# Altium PCB John_Main.PcbDoc (part 5 of 5)
Units mil, origin at the board's own origin, x right, y up, seen from the top; angles counter-clockwise.
Board outline 3346 x 2756 mil, 2 copper layers (Top Layer, Bottom Layer), stack 57 mil thick; 275 components, 161 nets, 721 pads, 398 vias.
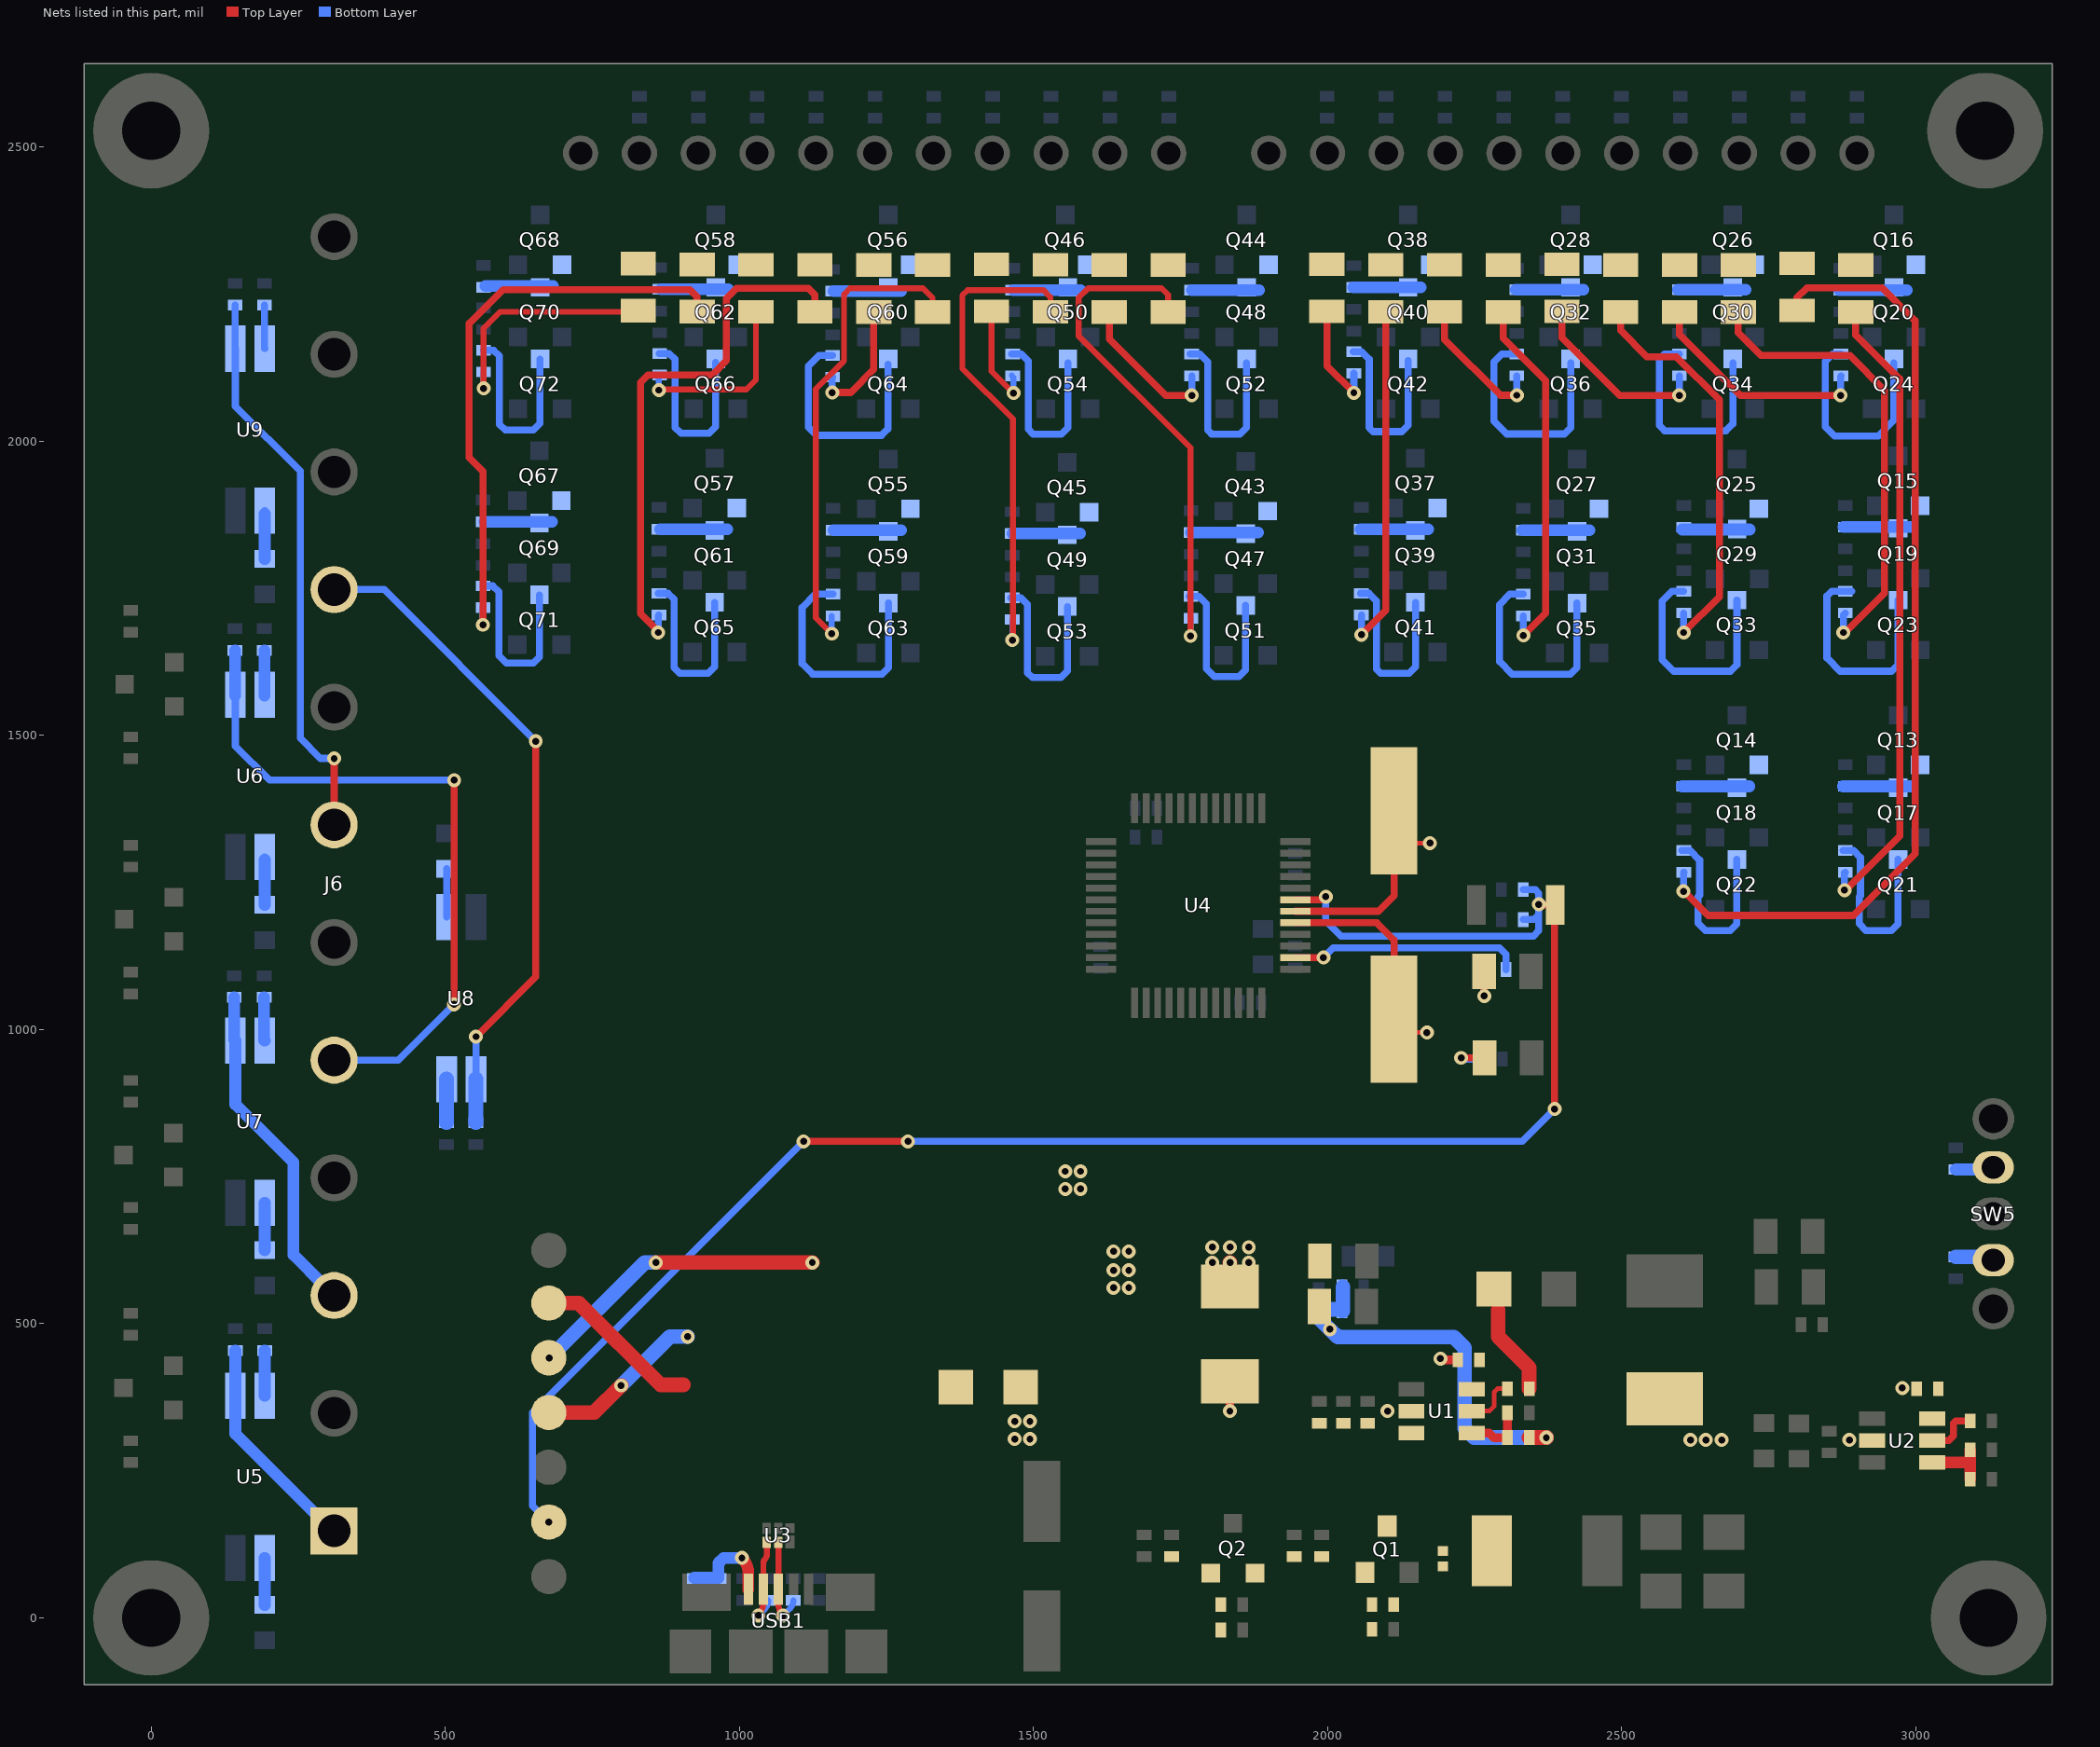
[diagram p3: the nets of this part, all layers, seen from the top]

## Via types
v1: diameter 23.62, hole 11.81, Top Layer to Bottom Layer, tented both sides, 233 vias
v2: diameter 23.62, hole 15.75, Top Layer to Bottom Layer, tented both sides, 165 vias

## Nets (pads, with @x,y where several pads share a name; then routed paths per layer and width w, separated by ;. In a path a pad name is that pad's centre, name@x,y a point inside that pad or via, vN(x,y) a via of type N, cw(c..) or ccw(c..) an arc to the next point about the centre after c; other vN are vias at no path point) (continued)
MCU_5V: C1.1 C10.1 CF1.1 D1.K D2.K J4.1 R1.2 U1.3 | length 670.5
  Top Layer w25: v1(858,604) v1(1124,604) ; 2290,524 2290,478 2342.81,425.19 R1.2@2342.81,389.5
  Bottom Layer w25: v1(677,442) 839,604 v1(858,604)
  other v1: 1468,304 1494,304 1468,334 1494,334
NetC2_1: C2.1 U1.6
NetC13_1: C13.1 Q1.1 Q2.2 R7.2 R8.2 R9.1
NetC14_1: C14.1 R8.1
NetC14_2: C14.2 F1.1 Q1.3
NetC17_2: C17.2 Q2.1 R6.2 R10.2
NetCF5_1: CF5.1 U2.6
NetLED1_1: LED1.1 R3.1 | length 75.5
  Top Layer w12: v1(2227,952) LED1.1@2267,952
  Bottom Layer w12: v1(2227,952) 2227,950 R3.1@2260.5,950
NetLED2_1: LED2.1 R58.2 | length 91.2
  Top Layer w12: LED2.1@2266,1103 2266.5,1102.5 v1(2266.5,1057)
  Bottom Layer w12: v1(2266.5,1057) R58.2@2266.5,1102
NetLED3_2: LED3.2 R67.1 | length 1086.2
  Top Layer w12: v1(2879,1237) 2881,1237 2973,1329 2973,2106 2898,2181 LED3.2@2898,2219.69 LED3.2@2898,2221
  Bottom Layer w12: v1(2879,1237) 2879,1266.18 R67.1@2880.32,1267.5
NetLED4_2: LED4.2 R68.1 | length 1647.8
  Top Layer w12: v1(2605,1235) 2606,1235 2647,1194 2893.94,1194 2999,1299.06 2999,2205.06 2943.06,2261 2815,2261 2798.11,2244.11 LED4.2@2798.11,2222.65 LED4.2@2798.11,2221
  Bottom Layer w12: v1(2605,1235) 2605,1266.07 2606,1267.07 R68.1@2605.58,1267.5
NetLED5_2: LED5.2 R69.1 | length 803
  Top Layer w12: LED5.2@2698.22,2221 LED5.2@2698.22,2219.65 2698.22,2184.78 2737,2146 2888,2146 2947,2087 2947,1741.68 2880.32,1675 v1(2877,1675)
  Bottom Layer w12: v1(2877,1675) 2877,1704.86 R69.1@2880.32,1708.18
NetLED6_2: LED6.2 R70.1 | length 389.5
  Top Layer w12: LED6.2@2598.33,2221 2598.33,2181.67 2702,2078 v1(2872,2078)
  Bottom Layer w12: v1(2872,2078) 2872,2110.23 R70.1@2872.95,2111.18
NetLED7_2: LED7.2 R79.1 | length 706.3
  Top Layer w12: LED7.2@2498.44,2221 2498.44,2188.56 2543,2144 2593,2144 2666,2071 2666,1735.42 v1(2605.58,1675) v1@2609,1675
  Bottom Layer w12: v1(2605.58,1675) R79.1@2605.58,1708.18
NetLED8_2: LED8.2 R80.1 | length 318.2
  Top Layer w12: LED8.2@2398.56,2221 2398.56,2176.44 2496.9,2078.1 v1(2598,2078.1)
  Bottom Layer w12: v1(2598,2078.1) 2598,2111.28 R80.1@2598.21,2111.5
NetLED9_2: LED9.2 R81.1 | length 629.9
  Top Layer w12: LED9.2@2298.67,2221 2298.67,2175.33 2371,2103 2371,1708.17 v1(2332.83,1670)
  Bottom Layer w12: v1(2332.83,1670) R81.1@2332.83,1703.18
NetLED10_2: LED10.2 R82.1 | length 243.3
  Top Layer w12: LED10.2@2198.78,2221 LED10.2@2198.78,2220.15 2198.78,2173.22 2293.68,2078.32 v1(2321.82,2078.32)
  Bottom Layer w12: v1(2321.82,2078.32) R82.1@2321.82,2111.5
NetLED11_2: LED11.2 R87.1 | length 600
  Top Layer w12: v1(2057.55,1671.32) 2098.89,1712.66 LED11.2@2098.89,2221
  Bottom Layer w12: v1(2057.55,1671.32) R87.1@2057.55,1704.5
NetLED12_2: LED12.2 R88.1 | length 190.8
  Top Layer w12: LED12.2@1999,2221 1999,2128.04 v1(2044.72,2082.32)
  Bottom Layer w12: v1(2044.72,2082.32) R88.1@2044.72,2115.5
NetLED13_2: LED13.2 R98.1 | length 876.9
  Top Layer w10: LED13.2@1729,2220 1729,2249 1718,2260 1593,2260 1577,2244 1577,2179 1767,1989 v1(1767,1669)
  Bottom Layer w10: v1(1767,1669) R98.1@1767,1700
NetLED14_2: LED14.2 R99.1 | length 259.2
  Top Layer w12: LED14.2@1628.89,2220 1628.89,2174.11 1725,2078 v1(1769.17,2078)
  Bottom Layer w12: v1(1769.17,2078) R99.1@1769.17,2111.17
NetLED15_2: LED15.2 R100.1 | length 838.6
  Top Layer w10: v1(1464,1662) 1465,1663 1465,2038 1379,2124 1379,2248 1388,2257 1517,2257 1528.78,2245.22 LED15.2@1528.78,2220
  Bottom Layer w10: v1(1464,1662) R100.1@1464,1695
NetLED16_2: LED16.2 R101.1 | length 184.7
  Top Layer w10: LED16.2@1428.67,2220 1428.67,2119.33 v1(1466,2082)
  Bottom Layer w10: R101.1@1463,2112 1466,2109 v1(1466,2082)
NetLED17_2: LED17.2 R110.1 | length 823.1
  Top Layer w10: v1(1157,1673) 1130,1700 1130,2089 1178,2137 1178,2250 1188,2260 1312,2260 1328.56,2243.44 LED17.2@1328.56,2220
  Bottom Layer w10: v1(1157,1673) R110.1@1157,1703
NetLED18_2: LED18.2 R111.1 | length 210.7
  Top Layer w12: v1(1158,2083) 1189,2083 1228.44,2122.44 LED18.2@1228.44,2220
  Bottom Layer w12: v1(1158,2083) 1158,2108.69 R111.1@1158.48,2109.18
NetLED19_2: LED19.2 R112.1 | length 926.3
  Top Layer w12: v1(862,1675) 863,1676 832,1707 832,2100 845,2113 954,2113 978,2137 978,2243 995,2260 1117,2260 1128.33,2248.67 LED19.2@1128.33,2220.15 LED19.2@1128.33,2220
  Bottom Layer w12: v1(862,1675) 862,1703.38 R112.1@863.12,1704.5
NetLED20_2: LED20.2 R113.1 | length 314.5
  Top Layer w10: v1(863.12,2087) 863.12,2088.38 1011.66,2088.38 1028.22,2104.94 LED20.2@1028.22,2220
  Bottom Layer w10: v1(863.12,2087) 863.12,2111.12 R113.1@864.5,2112.5
NetLED21_2: LED21.2 R118.1 | length 994.1
  Top Layer w12: v1(564,1688) 564,1949 540.28,1972.72 540.28,2200.28 598,2258 916,2258 928.11,2245.89 LED21.2@928.11,2220
  Bottom Layer w12: v1(564,1688) 564,1716.81 R118.1@564.37,1717.18
NetLED22_2: LED22.2 R119.1 | length 403.8
  Top Layer w10: v1(565.09,2090) 565.09,2192.09 593,2220 LED22.2@828,2220
  Bottom Layer w10: v1@565.09,2090.73 R119.1@565.09,2118
NetQ13_1: Q13.1 Q17.3 R59.1 | length 114.5
  Bottom Layer w20: R59.1@2876.49,1413.5 2990.99,1413.5
NetQ14_1: Q14.1 Q18.3 R60.1 | length 114.5
  Bottom Layer w20: R60.1@2602.49,1413.5 2716.99,1413.5
NetQ15_1: Q15.1 Q19.3 R61.1 | length 114.5
  Bottom Layer w20: R61.1@2876.99,1854.18 2991.49,1854.18
NetQ16_1: Q16.1 Q20.3 R62.1 | length 114.5
  Bottom Layer w20: R62.1@2869.99,2257.18 2984.49,2257.18
NetQ21_3: Q21.3 R67.2 | length 332.8
  Bottom Layer w12: R67.2@2876.47,1304.5 R67.2@2880.32,1304.5 2894.5,1304.5 2906,1293 2906,1227.96 2903.85,1225.81 2903.85,1180.15 2915.5,1168.5 2958.4,1168.5 2969.5,1179.59 Q21.3@2969.5,1289.32
NetQ22_3: Q22.3 R68.2 | length 330.3
  Bottom Layer w12: R68.2@2602.47,1304.5 R68.2@2605.58,1304.5 2616.4,1304.5 2632.59,1288.3 2632.59,1228.55 2629.85,1225.81 2629.85,1181.15 2642.5,1168.5 2684.4,1168.5 2695.5,1179.59 Q22.3@2695.5,1289.32
NetQ23_3: Q23.3 R69.2 | length 395.1
  Bottom Layer w12: R69.2@2890.91,1745.18 R69.2@2880.32,1745.18 2857.18,1745.18 2849,1737 2849,1632 2871.82,1609.18 2958.91,1609.18 2970,1620.27 Q23.3@2970,1730
NetQ24_3: Q24.3 R70.2 | length 374
  Bottom Layer w12: R70.2@2872.95,2148.18 2859.18,2148.18 2846.5,2135.5 2846.5,2024.5 2862,2009 2936.41,2009 2963,2035.59 Q24.3@2963,2133
NetQ25_1: Q25.1 Q29.3 R71.1 | length 114.5
  Bottom Layer w20: R71.1@2602.99,1850.18 2717.49,1850.18
NetQ26_1: Q26.1 Q30.3 R72.1 | length 114.5
  Bottom Layer w20: R72.1@2596,2257.5 2710.5,2257.5
NetQ27_1: Q27.1 Q31.3 R73.1 | length 114.5
  Bottom Layer w20: R73.1@2330.99,1849.18 2445.49,1849.18
NetQ28_1: Q28.1 Q32.3 R74.1 | length 114.5
  Bottom Layer w20: R74.1@2320.36,2257.5 2434.86,2257.5
NetQ33_3: Q33.3 R79.2 | length 392.7
  Bottom Layer w12: R79.2@2605.58,1745.18 2585.44,1745.18 2569,1728.74 2569,1629 2588.82,1609.18 2684.91,1609.18 2696,1620.27 Q33.3@2696,1730
NetQ34_3: Q34.3 R80.2 | length 387.3
  Bottom Layer w12: R80.2@2598.21,2148.5 2572.99,2148.5 2564,2139.5 2564,2027.26 2573.26,2018 2677,2018 2689.01,2030.01 Q34.3@2689.01,2133.32
NetQ35_3: Q35.3 R81.2 | length 399.8
  Bottom Layer w12: R81.2@2332.83,1740.18 2309.9,1740.18 2292.1,1722.38 2292.1,1625.9 2313.82,1604.18 2412.91,1604.18 2424,1615.27 Q35.3@2424,1725
NetQ36_3: Q36.3 R82.2 | length 398.9
  Bottom Layer w12: R82.2@2321.82,2148.5 2296.5,2148.5 2283,2135 2283,2034.15 2304.65,2012.5 2402.27,2012.5 2413.36,2023.59 Q36.3@2413.36,2133.32
NetQ37_1: Q37.1 Q39.3 R83.1 | length 114.5
  Bottom Layer w20: R83.1@2056.45,1850.5 2170.95,1850.5
NetQ38_1: Q38.1 Q40.3 R84.1 | length 114.5
  Bottom Layer w20: R84.1@2044,2261.5 2158.5,2261.5
NetQ41_3: Q41.3 R87.2 | length 331.6
  Bottom Layer w12: R87.2@2056.43,1741.5 2070.36,1741.5 2083.26,1728.6 2083.26,1612.6 2090.36,1605.5 2138.36,1605.5 2149.46,1616.59 Q41.3@2149.46,1726.32
NetQ42_3: Q42.3 R88.2 | length 331.6
  Bottom Layer w12: R88.2@2043.98,2152.5 2057.91,2152.5 2070.81,2139.6 2070.81,2023.6 2077.91,2016.5 2125.91,2016.5 2137.01,2027.59 Q42.3@2137.01,2137.32
NetQ43_1: Q43.1 Q47.3 R90.1 | length 114.5
  Bottom Layer w20: R90.1@1767.61,1845.17 1882.11,1845.17
NetQ44_1: Q44.1 Q48.3 R91.1 | length 114.5
  Bottom Layer w20: R91.1@1769.17,2257.17 1883.69,2257.17
NetQ45_1: Q45.1 Q49.3 R92.1 | length 114.5
  Bottom Layer w20: R92.1@1464.52,1843.26 1579.02,1843.26
NetQ46_1: Q46.1 Q50.3 R93.1 | length 114.5
  Bottom Layer w20: R93.1@1465.61,2257.26 1580.11,2257.26
NetQ51_3: Q51.3 R98.2 | length 331.3
  Bottom Layer w12: R98.2@1764.61,1736.17 R98.2@1767.96,1736.17 1781.52,1736.17 1794,1723.7 1794,1613.3 1807.13,1600.17 1849.52,1600.17 1860.62,1611.27 Q51.3@1860.62,1721
NetQ52_3: Q52.3 R99.2 | length 334.6
  Bottom Layer w12: R99.2@1766.19,2148.17 R99.2@1769.17,2148.17 1783.1,2148.17 1796,2135.27 1796,2019.27 1803.1,2012.17 1851.1,2012.17 1862.2,2023.27 Q52.3@1862.2,2133
NetQ53_3: Q53.3 R100.2 | length 334.6
  Bottom Layer w12: R100.2@1461.51,1734.26 R100.2@1464.12,1734.26 1478.43,1734.26 1490,1722.69 1490,1606.69 1498.43,1598.26 1546.43,1598.26 1557.52,1609.35 Q53.3@1557.52,1719.08
NetQ54_3: Q54.3 R101.2 | length 334.6
  Bottom Layer w12: R101.2@1462.61,2148.26 R101.2@1464.84,2148.26 1479.52,2148.26 1491,2136.78 1491,2020.78 1499.52,2012.26 1547.52,2012.26 1558.62,2023.35 Q54.3@1558.62,2133.08
NetQ55_1: Q55.1 Q59.3 R102.1 | length 114.5
  Bottom Layer w20: R102.1@1160.43,1849.18 1274.93,1849.18
NetQ56_1: Q56.1 Q60.3 R103.1 | length 114.5
  Bottom Layer w20: R103.1@1159.99,2255.18 1274.49,2255.18
NetQ57_1: Q57.1 Q61.3 R104.1 | length 114.5
  Bottom Layer w20: R104.1@865,1850.5 979.5,1850.5
NetQ58_1: Q58.1 Q62.3 R105.1 | length 114.5
  Bottom Layer w20: R105.1@866.76,2258.5 981.26,2258.5
NetQ63_3: Q63.3 R110.2 | length 425.9
  Bottom Layer w12: R110.2@1159.29,1740.18 1129.18,1740.18 1106.6,1717.6 1106.6,1622.4 1124.82,1604.18 1242.34,1604.18 1253.43,1615.28 Q63.3@1253.43,1725
NetQ64_3: Q64.3 R111.2 | length 409.1
  Bottom Layer w12: R111.2@1158.48,2146.18 1135.18,2146.18 1117,2128 1117,2024 1130.82,2010.18 1241.91,2010.18 1253,2021.27 Q64.3@1253,2131
NetQ65_3: Q65.3 R112.2 | length 334.6
  Bottom Layer w12: R112.2@862,1741.5 878.91,1741.5 888.91,1731.5 888.91,1615.5 898.91,1605.5 946.91,1605.5 958.01,1616.59 Q65.3@958.01,1726.32
NetQ66_3: Q66.3 R113.2 | length 334.6
  Bottom Layer w12: R113.2@863.76,2149.5 880.67,2149.5 890.67,2139.5 890.67,2023.5 900.67,2013.5 948.67,2013.5 959.76,2024.59 Q66.3@959.76,2134.32
NetQ67_1: Q67.1 Q69.3 R114.1 | length 114.5
  Bottom Layer w20: R114.1@566.99,1863.18 681.49,1863.18
NetQ68_1: Q68.1 Q70.3 R115.1 | length 114.5
  Bottom Layer w20: R115.1@568.09,2264 682.59,2264
NetQ71_3: Q71.3 R118.2 | length 323.7
  Bottom Layer w12: R118.2@563.99,1754.18 R118.2@564.37,1754.18 580.91,1754.18 590.91,1744.18 590.91,1636.09 604,1623 649.8,1623 660,1633.2 Q71.3@660,1739
NetQ72_3: Q72.3 R119.2 | length 334.6
  Bottom Layer w12: R119.2@565.09,2155 582,2155 592,2145 592,2029 602,2019 650,2019 661.09,2030.09 Q72.3@661.09,2139.82
NetR1_1: R1.1 U1.5 | length 90.6
  Top Layer w8: U1.5@2244.97,351.5 2274.94,351.5 2282.94,359.5 2282.94,383.5 2288.95,389.5 R1.1@2305.81,389.5
NetRF10_1: RF10.1 U2.5 | length 90.4
  Top Layer w12: U2.5@3028.12,301.5 3055.94,301.5 3063.94,309.5 3063.94,330.5 3068.12,334.68 RF10.1@3092.45,334.68
NetRU2_1: RU2.1 SW5.1 | length 65.4
  Bottom Layer w20: RU2.1@3068,762.21 3128.56,762.21 SW5.1@3132,765.66
NetRU3_1: RU3.1 SW5.3 | length 66.2
  Bottom Layer w25: RU3.1@3068,613.5 3126.68,613.5 SW5.3@3132,608.18
OPT_IN1: R5.1 U5.1 | length 80
  Bottom Layer w20: R5.1@193,22 U5.1@193,102
OPT_IN2: R13.1 U7.1 | length 80.4
  Bottom Layer w20: R13.1@193,625.19 U7.1@193,705.6
OPT_IN3: R14.1 U6.1 | length 158.3
  Bottom Layer w12: R14.1@193,1212 U6.1@193,1293.41
  Bottom Layer w20: R14.1@193,1212 U6.1@193,1288.91
OPT_IN4: R22.1 U9.1 | length 158.9
  Bottom Layer w12: R22.1@193,1800.02 U9.1@193,1882.02
  Bottom Layer w20: R22.1@193,1800.02 U9.1@193,1876.93
OPT_IN5: R21.1 U8.1 | length 82
  Bottom Layer w12: U8.1@502.12,1191.29 R21.1@502.12,1273.29
OPT_OUT1: J6.1 R12.2 U5.3 | length 377.8
  Bottom Layer w20: R12.2@143,454.5 U5.3@143,377.59 143,313 308,148 J6.1@311,148
OPT_OUT2: J6.3 R20.2 U7.3 | length 573.2
  Bottom Layer w20: R20.2@141,1054.69 141,983.19 U7.3@143,981.19 143,873 242,774 242,617 294.74,564.26 301.47,571 J6.3@311,571
OPT_OUT3: J6.5 R19.2 U6.3 | length 1258.1
  Top Layer w12: v1(514.9,1043) 514.9,1422 v1@515,1422.1
  Bottom Layer w12: R19.2@142.38,1644.5 142.38,1569.62 U6.3@143,1569 143,1482 201,1424 514.9,1424 v1(515,1424.1) ; J6.5@311,948 419.9,948 v1(514.9,1043)
  Bottom Layer w20: U6.3@142.38,1567.59 R19.2@142.38,1644.5
OPT_OUT4: J6.7 R26.2 U9.3 | length 966.8
  Top Layer w12: J6.7@311,1348 v1(311,1461)
  Bottom Layer w12: R26.2@142.52,2231.52 142.52,2158.09 U9.3@143,2157.61 143,2060 253.5,1949.5 253.5,1495.5 288,1461 v1(311,1461)
OPT_OUT5: J6.9 R25.2 U8.3 | length 1140.2
  Top Layer w12: v1(552.12,988) 653.8,1089.68 v1(653.8,1490.3)
  Bottom Layer w12: J6.9@311,1748 396.09,1748 v1(653.8,1490.3) ; U8.3@552.12,915.7 v1(552.12,988)
  Bottom Layer w25: R25.2@552.12,841.79 U8.3@552.12,915.7
PIN4_1: R11.1 U5.4 | length 76.9
  Bottom Layer w20: U5.4@193,377.59 R11.1@193,454.5
PIN4_2: R15.1 U7.4 | length 73.9
  Bottom Layer w20: R15.1@192,1054.69 192,982.19 U7.4@193,981.19
PIN4_3: R18.1 U6.4 | length 152.7
  Bottom Layer w12: R18.1@192.38,1644.5 192.38,1569.62 U6.4@193,1569
  Bottom Layer w20: U6.4@192.38,1567.59 R18.1@192.38,1644.5
PIN4_4: R24.1 U9.4 | length 74.1
  Bottom Layer w12: R24.1@192.52,2231.52 192.52,2158.09 U9.4@193,2157.61
PIN4_5: R23.1 U8.4 | length 73.9
  Bottom Layer w25: R23.1@502.12,841.79 U8.4@502.12,915.7
RST#: CU8.2 J8.1 RU1.1 SW4.2 U4.7 | length 3119.4
  Top Layer w12: v1(1109,810) v1(1286.71,810) ; U4.7@1945.35,1220.84 1991.84,1220.84 v1(1997,1226) ; v1(2359,1213) 2360,1212 SW4.2@2386.93,1212 2386,1211.07 v1(2386,865)
  Bottom Layer w12: v1(676,162.87) 648,190.87 648,349 v1(1109,810) ; v1(1286.71,810) 2331,810 v1(2386,865) ; v1(1997,1226) 1997,1184.74 2022.74,1159 2350,1159 2359,1168 2359,1195 ; CU8.2@2332.5,1187 2351,1187 2359,1195 ; RU1.1@2332.5,1238 2353,1238 2359,1232 v1(2359,1213) 2359,1195
SW#: CF5.2 LF1.1 U2.2
  other v1: 2616.94,302.5 2643.25,302.5 2670.06,302.5 2887.06,302.5 2977.06,390.66
SW_: C2.2 L1.1 U1.2 | length 81.2
  Top Layer w15: v1@1833.94,352.5 L1.1@1833.94,402.04 ; v1(2191.94,440.66) 2191.94,438.5 C2.2@2221.44,438.5
  other v1: 1833.94,351.5 2101.94,351.5
TEST#: R58.1 U4.2 | length 395.3
  Top Layer w12: U4.2@1945.35,1122.42 v1(1993,1122.42)
  Bottom Layer w12: v1(1993,1122.42) 2009.58,1139 2292.1,1139 2303.5,1127.6 R58.1@2303.5,1102
USB_D+: R17.2 U3.2 USB1.3 | length 158.4
  Top Layer w10: U3.2@1066.44,128 USB1.3@1066.44,48.32 1066.44,23.13 ccw(c1093.49,23.13) v1(1074.36,4)
  Bottom Layer w10: v1(1074.36,4) 1086.26,15.9 ccw(c1072.35,29.82) R17.2@1092.03,29.82
USB_D-: R16.2 U3.1 USB1.2 | length 159.8
  Top Layer w10: v1(1032.36,4) 1032.36,6 ccw(c1011.87,26.49) 1040.85,26.49 USB1.2@1040.85,48.32 1040.85,93.43 cw(c1049.43,93.43) 1043.36,99.5 ccw(c1035.17,107.68) 1046.75,107.68 U3.1@1046.75,128
  Bottom Layer w10: v1(1032.36,4) 1043.13,14.77 ccw(c1028.08,29.82) R16.2@1049.36,29.82
VBUS: C32.1 C33.1 D2.A J2.1 USB1.1 | length 453
  Top Layer w20: v1(1004.36,102) cw(c978.06,75.7) 1015.25,75.7 USB1.1@1015.25,48.32
  Top Layer w25: J2.1@676,535.14 726.86,535.14 866,396 905,396
  Bottom Layer w20: C32.1@923.36,68 964.36,68 964.36,93 973.36,102 v1(1004.36,102)
VCC_3V3: C8.1 C9.2 C23.1 CS1.2 FB1.1 J3.1 L1.2 LED3.1 LED4.1 LED5.1 LED6.1 LED7.1 LED8.1 LED9.1 LED10.1 LED11.1 LED12.1 LED13.1 LED14.1 LED15.1 LED16.1 LED17.1 LED18.1 LED19.1 LED20.1 LED21.1 LED22.1 R2.2 | length 1007.2
  Top Layer w25: J3.1@676,349 753,349 v1(799,395) ; L1.2@1833.94,563.26 1834,563.32 v1(1834,604) ; R2.2@2342.81,306.5 v1(2371.94,306.5)
  Bottom Layer w25: v1(799,395) 882,478 v1(912,478) ; C23.1@2024.44,521.88 2021.65,524.66 FB1.1@1984.94,524.66 1984.94,509.5 v1(2003.94,490.5) 2017.25,477.19 2214.83,477.19 2232.94,459.08 2232.94,322.5 2248.94,306.5 v1(2371.94,306.5) ; C23.1@2025.94,521.88 C8.1@2025.94,562.88
  other v1: 1636,561 1662,561 1636,591 1662,591 1804,604 1866,604 1636,623 1662,623 1804,630 1834,630 1866,630 1554,729 1580,729 1554,759 1580,759
VFB#: RF2.2 RF3.2 U2.4 | length 114.3
  Top Layer w20: U2.4@3028.12,264.1 3092.45,264.1 ; RF2.2@3092.45,235.68 3092.45,264.1 ; RF3.2@3092.45,285.68 3092.45,264.1
VFB_: R2.1 R4.2 U1.4 | length 106
  Top Layer w15: U1.4@2244.97,314.1 2274.9,314.1 2282.5,306.5 R2.1@2305.81,306.5 R4.2@2305.81,348.5
X0: CU9.2 U4.5 X1.1 | length 441.2
  Top Layer w8: X1.1@2113,1007.99 2125.99,995 v1(2169,995)
  Top Layer w12: U4.5@1945.35,1181.47 2083.53,1181.47 2113,1152 X1.1@2113,1007.99
  Bottom Layer w8: CU9.2@2113,995 v1(2169,995)
X1: CU10.2 U4.6 X1.2 | length 400.2
  Top Layer w8: X1.2@2113,1327 X1.2@2114,1328 ; X1.2@2114,1317 v1(2174,1317)
  Top Layer w12: U4.6@1945.35,1201.16 2086.16,1201.16 2113,1228 X1.2@2113,1327
  Bottom Layer w8: CU10.2@2113,1317.01 2140,1317 v1(2174,1317)
pads on no net: J6.10 SW5.MH1 SW5.MH2 U3.5 U3.6 U4.3 U4.4 U4.28 USB1.4

## Polygon pours and split planes (outlines as drawn)
GND on Bottom Layer "Bottom Layer-GND" (hatched 45Degree grid 20 track 10, remove dead copper, pour order 8): -80,2606 3199,2606 3199,-86 -80,-86
GND on Top Layer "Top Layer-GND" (hatched 45Degree grid 18 track 10, remove dead copper, pour order 6): -79,2615 3201,2615 3201,-82 -79,-82

## Other copper
Top Layer:
  rectangle net GPIOH3_O: 21.72,1603.83 386.72,1646.83
  rectangle net GPIOH2_O: 20.87,1202.5 385.87,1245.5
  rectangle net GPIOH1_O: 19.93,804.6 384.93,847.6
  rectangle net GPIOH0_O: 20,406 385,449
  rectangle net MCU_5V: 1973,318 2081,343
  rectangle net NetC2_1: 2241.94,376.5 2268.94,456
  rectangle net M_VDD: 1885,1019 1973,1109
  region net VCC_3V3: 2680,713 2680,860 2613,860 2613,713
  rectangle net VCC_3V3: 1527,712 2680,777
  rectangle net VCC_3V3: 2613,816 2954,876
  region net VCC_3V3: 2954,816 2954,1045 2884,1045 2884,816
  rectangle net VCC_3V3: 2887.06,986 3113,1046
  region net VCC_3V3: 3113,990 3113,2313 3052,2313 3052,990
  rectangle net VCC_3V3: 2928,2275 3113,2319
  rectangle net M_VDD: 882,525 1595,567
  region net M_VDD: 1527,705 1527,525.5 1594,525.5 1594,705
  rectangle net M_VDD: 1576,652 1685,705
  region net VCC_3V3: 1684,440 1684,514 882,514 882,440
  rectangle net 5V: 2963,895 3205,978
  rectangle net 5V: 2962,770 3085,978
  region net 5V: 3087,697 3087,807 2716,807 2716,697
  rectangle net 5V: 2691,631 2786,807
  rectangle net 5V: 3120,895 3205,2418
  rectangle net 5V: 2941,2328 3205,2420
  rectangle net VCC_3V3: 1610,441 1684,644
  rectangle net 5V: 2941,2361 3003,2602
  rectangle net 5V: 495,2312 685,2606
  rectangle net VCC_3V3: 798,2275 2934,2319
  rectangle net 5V: 495,2527 3004,2606
  rectangle net MCU_5V: 1700,410 1768,705
  rectangle net MCU_5V: 1741,654.5 2318,705
  rectangle net MCU_5V: 2175,491 2318,697
  rectangle net VCC_3V3: 1781,468.5 2020.94,643.5
  rectangle net 12V_IN: 399,-92 490,2286
  rectangle net 12V_IN: 146,2043 490,2290
  rectangle net M_VDD: -93.28,1566.83 -25.28,1607.81
  rectangle net M_VDD: -94.13,1167.5 -26.13,1208.48
  rectangle net M_VDD: -95.14,766.83 -27.14,807.81
  rectangle net M_VDD: -95,371 -27,411.99
  rectangle net M_VDD: -104,208 -69,1608
  rectangle net GPIOH3_O#: 23,1500 370,1595
  rectangle net GPIOH2_O#: 23,1100 370,1195
  rectangle net GPIOH1_O#: 22,700 370,795
  rectangle net GPIOH0_O#: 22,300 370,395
  rectangle net 12V: 2945,99 3068.76,231
  rectangle net VBUS: 1013,170 1073,288
  rectangle net GND: 1082,83 1321,269
  rectangle net VBUS: 881,90 1025.47,319
  rectangle net VBUS: 881,281 1423.23,429.4
  rectangle net MCU_5V: 1441,284 1768,432
  region net GND: 975.36,-16 975.36,-96 1136.36,-96 1136.36,-16
  region net GND: 531,80.82 531,-96 988.86,-96 988.86,80.82
  region net GND: 1108.36,75 1108.36,-96.5 1267.36,-96.5 1267.36,75
  rectangle net 5V: 2338,492.5 2520,596.41
  rectangle net NetC14_1: 2180.1,7.5 2216.1,96.5
  rectangle net NetC14_1: 2102.6,7.5 2216.1,40
  rectangle net NetC14_2: 2224.1,7.5 2364.1,110.5
  rectangle net NetC14_2: 2182.1,104.5 2364.1,138.5
  rectangle net GND: 2102.6,-59.5 2369.1,-2
  rectangle net NetC14_2: 2085.6,132.5 2364.1,268.5
  rectangle net NetC13_1: 1852.1,52.5 1961.1,113.5
  rectangle net NetC13_1: 1935.1,-38 2085.6,114.5
  rectangle net 12V: 2377.1,-35.5 2512.1,110.5
  rectangle net 12V: 2377.1,99.86 2957,269.5
  rectangle net GND: 2522.1,-88.5 3015,79.5
  rectangle net GND: 1845.6,-79.5 1921.1,40
  rectangle net GND: 1692.1,-96.5 3015,-47.5
  rectangle net NetC17_2: 1717.6,-38 1828.6,114
  rectangle net GND: 1109.53,-96.5 1704.1,113.5
  rectangle net 12V_IN: 1330.33,127 2072.1,267.5
  rectangle net 5V: 2738.94,492.5 2813.94,518.5
  rectangle net GND: 2797.79,526.5 2948.94,686.5
  rectangle net SW#: 2961.06,371 3016.56,408.5
  rectangle net NetCF5_1: 3028.44,326.5 3050.94,407
  rectangle net GND: 2825.26,465.5 2949.94,686.5
  rectangle net GND: 2840.94,320.5 2863.94,329.5
  rectangle net GND: 2715,325.5 2949.94,477.5
  rectangle net 12V: 2443.02,236.5 2955.94,277.5
  rectangle net 5V: 2440.94,492.5 2785.88,687.5
  rectangle net SW#: 2874.06,285.5 2951.06,318.5
  rectangle net SW#: 2443.02,285.5 2702.86,448.5
  rectangle net MCU_5V: 1441,284 2165.94,328
  rectangle net GND: 1950.94,358 2081,460.5
  rectangle net SW_: 1780.94,335.5 1889,441
  rectangle net GND: 2032.94,377 2165.94,642.5
  rectangle net SW_: 2175.94,421 2231.44,458.5
  rectangle net SW_: 2088.94,335.5 2165.94,368.5
Bottom Layer:
  rectangle net GND: 30,127 164,248
  rectangle net GND: 90,60 163.5,248
  rectangle net GND: 64,647.59 163.5,763.59
  rectangle net GND: 64,1235.39 163.5,1351.39
  rectangle net GND: 64,1824 163.5,1940
  rectangle net GND: 126,2571 2924.61,2618
  region net VCC_3V3: 1606,546 1606,777 1527,777 1527,546
  rectangle net MCU_5V: 1101,566 1519,644
  region net MCU_5V: 1519,284 1519,644 1441,644 1441,284
  rectangle net M_VDD: 1616,652 2057,706
  rectangle net M_VDD: 1969,593 2057,705
  rectangle net VCC_3V3: 1527,545 1956,644
  rectangle net GND: 1816,2449 1955.31,2618
  rectangle net GND: 481,2452 788,2605
  rectangle net GND: 126,2336 538,2605
  rectangle net NetQ68_1: 651.09,2245.5 729.09,2318.5
  rectangle net NetQ58_1: 949.76,2240 1027.76,2313
  rectangle net NetQ38_1: 2127,2243 2205,2316
  rectangle net NetQ37_1: 2139.45,1832 2217.45,1905
  rectangle net NetQ28_1: 2403.36,2239 2481.36,2312
  rectangle net NetQ57_1: 948,1832 1026,1905
  rectangle net NetQ56_1: 1242.99,2236.68 1320.99,2309.68
  rectangle net NetQ55_1: 1243.43,1830.68 1321.43,1903.68
  rectangle net NetQ45_1: 1547.52,1824.76 1625.52,1897.76
  rectangle net NetQ44_1: 1852.19,2238.67 1930.19,2311.67
  rectangle net NetQ43_1: 1850.61,1826.67 1928.61,1899.67
  rectangle net NetQ27_1: 2413.99,1830.68 2491.99,1903.68
  rectangle net NetQ26_1: 2679,2239 2757,2312
  rectangle net NetQ25_1: 2685.99,1835.68 2763.99,1902
  rectangle net NetQ16_1: 2952.99,2238.68 3030.99,2311.68
  rectangle net NetQ15_1: 2959.99,1835.68 3037.99,1908.68
  rectangle net NetQ14_1: 2685.49,1395 2763.49,1468
  rectangle net NetQ13_1: 2959.49,1395 3037.49,1468
  rectangle net NetQ67_1: 649.99,1844.68 727.99,1917.68
  rectangle net NetQ46_1: 1548.61,2238.76 1626.61,2311.76
  rectangle net 12V_IN: 398,-97 1453,-27
  rectangle net 12V_IN: 1330.33,-97 1453,267.5
  rectangle net GND: -15,2292 537,2405
  rectangle net GND: -67,128 78,2405
  region net USB_D-: 1027.36,39 1027.36,-8 1052.36,-8 1052.36,39
  region net USB_D+: 1070.36,40 1070.36,-8 1105.36,-8 1105.36,40
  rectangle net 12V_IN: 2013.1,55.5 2161.1,189.5
  rectangle net SW#: 2874.06,285.5 2904.06,405.5
  region net SW#: 2874.06,405.5 2874.06,375.5 2994.06,375.5 2994.06,405.5
  rectangle net SW#: 2572.94,285.5 2904.06,318.5
  region net SW_: 2088.94,455.5 2088.94,425.5 2208.94,425.5 2208.94,455.5
  rectangle net SW_: 2088.94,335.5 2118.94,455.5
  rectangle net SW_: 1815,335.5 2118.94,368.5
  rectangle net RST#: 2320,1172 2376,1254
  rectangle net GND: 1864,1134 1968,1195
  pour cut-out: 2742.94,654.5 2742.94,272.5 2418.94,272.5 2418.94,654.5

## Silkscreen, mask and mechanical layers (free items; w line width, h text height)
Top Overlay:
  drawing of 3876 lines, arcs and shapes, not listed
  text "Pin 12" at 143,2473 h120
  text "RES 1K = ^" at 3160,2377 h40 r270
  text "CAP 0.1uF = #" at 2987,2376 h40 r270
  text "RES 330 = &" at 3044.67,2376 h40 r270
  text "RES 10K = *" at 3102.33,2376 h40 r270
  text "GND" at -110,2300 h120
  text "CON_18" at 998.22,2152.52 h60 r270
  text "CON_17" at 1099.33,2152.52 h60 r270
  text "CON_16" at 1197.44,2152.75 h60 r270
  text "CON_15" at 1298.56,2152.9 h60 r270
  text "CON_14" at 1399.66,2153.1 h60 r270
  text "CON_13" at 1499.77,2152.58 h60 r270
  text "CON_20" at 798,2152.4 h60 r270
  text "CON_19" at 899.11,2152.46 h60 r270
  text "CON_12" at 1598.89,2152.4 h60 r270
  text "CON_11" at 1701,2152.4 h60 r270
  text "CON_10" at 1970,2152.4 h60 r270
  text "CON_9" at 2070,2152.4 h60 r270
  text "CON_8" at 2170,2152.4 h60 r270
  text "CON_7" at 2271,2152.4 h60 r270
  text "CON_6" at 2370,2152.4 h60 r270
  text "CON_5" at 2470,2152.4 h60 r270
  text "CON_4" at 2568,2152.4 h60 r270
  text "CON_3" at 2668,2152.4 h60 r270
  text "CON_2" at 2769,2152.4 h60 r270
  text "CON_1" at 2869.17,2152.4 h60 r270
  text "+12" at -110,2095 h140
  text "NC" at -110,1895 h140
  text "Y_4" at 144,1669 h100 r90
  text "Manufacturing Security Solutions for the Self Storage Industry" at 1433,1643 h50
  text "IN_3" at 146,1456 h100 r90
  text "*" at -87,1443 h40
  text "Y_3" at 144,1269 h100 r90
  text "RESET" at 2410,1184 h50
  text "*" at -94,1075 h40 r270
  text "TEST" at 2406,1073 h50
  text "IN_2" at 146,1056 h100 r90
  text "POWER" at 2407,927 h50
  text "Y_2" at 144,869 h100 r90
  text "ZERO CARBON FOOTPRINT" at 578,818 h38
  text "IN_1" at 146,656 h100 r90
  text "*" at -87,643 h40
  text "12V BUS" at 714,612.27 h50
  text "VBUS" at 712,519.2 h50
  text "Y_1" at 144,469 h100 r90
  text "#" at 2279.94,459.5 h40 r180
  text "#" at 2986,455.5 h40 r180
  text "MCU_5V" at 712,434.65 h50
  text "#" at 2060.94,429.5 h40 r180
  text "#" at 2840.67,380.5 h40 r180
  text "*" at 2365.94,368.5 h40
  text "VCC_3V3" at 712,341.85 h50
  text "*" at 2365.94,328.5 h40
  text "*" at 3175.82,268 h40
  text "IN_0" at 146,256 h100 r90
  text "M_VDD" at 712,249.05 h50
  text "*" at -87,245 h40
  text "RST" at 712,148 h50
  text "#" at 1675.04,82.5 h40 r180
  text "Y_0" at 144,69 h100 r90
  text "GND" at 714,60 h50
  text "#" at 1878.1,-4.5 h40 r180
  text "Pin 1" at 143,-95 h150
Bottom Overlay:
  drawing of 3788 lines, arcs and shapes, not listed
  text "^" at 842.95,2594.68 h40
  text "^" at 944.95,2594.68 h40
  text "^" at 1043.95,2594.68 h40
  text "^" at 1142.95,2594.68 h40
  text "^" at 1243.95,2594.68 h40
  text "^" at 1343.95,2594.68 h40
  text "^" at 1442.95,2594.68 h40
  text "^" at 1543.95,2594.68 h40
  text "^" at 1643.95,2594.68 h40
  text "^" at 1742.95,2594.68 h40
  text "^" at 2012.95,2594.68 h40
  text "^" at 2112.95,2594.68 h40
  text "^" at 2211.95,2594.68 h40
  text "^" at 2314.95,2594.68 h40
  text "^" at 2413.95,2594.68 h40
  text "^" at 2512.95,2594.68 h40
  text "^" at 2613.95,2594.68 h40
  text "^" at 2712.95,2594.68 h40
  text "^" at 2814.95,2594.68 h40
  text "^" at 2913,2594 h40
  text "*" at 540.09,2276.5 h40
  text "*" at 2019.72,2276 h40
  text "*" at 839.5,2273 h40
  text "*" at 1440.61,2271.76 h40
  text "*" at 1744.19,2271.67 h40
  text "*" at 2296.82,2272 h40
  text "*" at 2573.21,2272 h40
  text "*" at 2847.95,2271.68 h40
  text "*" at 1133.48,2269.68 h40
  text "*" at 119,2241 h40 r90
  text "*" at 540.09,2202.5 h40
  text "*" at 2019.72,2202 h40
  text "*" at 839.5,2199 h40
  text "*" at 1440.61,2197.76 h40
  text "*" at 1744.19,2197.67 h40
  text "*" at 2296.82,2198 h40
  text "*" at 2573.21,2198 h40
  text "*" at 2847.95,2197.68 h40
  text "*" at 1133.48,2195.68 h40
  text "&" at 539.09,2126.82 h40
  text "&" at 2018.72,2126.32 h40
  text "&" at 838.5,2123.32 h40
  text "&" at 1439.61,2122.08 h40
  text "&" at 1743.19,2122 h40
  text "&" at 2295.82,2122.32 h40
  text "&" at 2572.21,2122.32 h40
  text "&" at 2846.95,2122 h40
  text "&" at 1132.48,2120 h40
  text "*" at 2580.58,1868.68 h40
  text "*" at 2855.32,1868.68 h40
  text "*" at 837,1867 h40
  text "*" at 1134,1867 h40
  text "*" at 2032.55,1865 h40
  text "*" at 2307.83,1863.68 h40
  text "*" at 1439,1859.68 h40
  text "*" at 1742,1860.5 h40
  text "*" at 539,1858 h40
  text "*" at 539,1805 h40
  text "*" at 2580.58,1794.68 h40
  text "*" at 2855.32,1794.68 h40
  text "*" at 837,1793 h40
  text "*" at 1133.48,1792 h40
  text "*" at 2032.55,1791 h40
  text "*" at 2307.83,1789.68 h40
  text "*" at 1439,1786 h40
  text "*" at 1742,1786 h40
  text "&" at 2579.58,1719 h40
  text "&" at 2854.32,1719 h40
  text "&" at 537,1718 h40
  text "&" at 2031.55,1715.32 h40
  text "&" at 2306.73,1712.68 h40
  text "&" at 838,1704 h40
  text "&" at 1133,1702 h40
  text "&" at 1742,1697 h40
  text "&" at 1439,1696 h40
  text "*" at 119,1656 h40 r90
  text "*" at 2580,1431 h40
  text "*" at 2855.49,1430 h40
  text "*" at 2580,1359 h40
  text "*" at 2855.49,1356 h40
  text "#" at 1646,1303 h50
  text "&" at 2854.49,1277 h40
  text "&" at 2580,1265 h40
  text "#" at 1976,1202 h50 r90
  text "#" at 2361,1202 h50 r180
  text "#" at 1595,1076 h50 r180
  text "#" at 1790,1073 h50 r180
  text "*" at 111,1033 h40
  text "*" at 573,775 h40 r90
  text "Manufacturing Security Solutions for the Self Storage Industry" at 1766,699 h50
  text "#" at 2124.94,550.38 h40 r90
  text "*" at 120,464 h40 r90
  text "RES 1K = ^" at 2958,95 h40
  text "RES 10K = *" at 2957,37.33 h40
  text "#" at 942.36,-19 h40 r90
  text "RES 330 = &" at 2957,-20.33 h40
  text "ZERO CARBON FOOTPRINT" at 2129,-47 h38
  text "CAP 0.1uF = #" at 2957,-78 h40
Mechanical 2:
  the board outline again, w10

## Dimensions
-114,2642 to 3232,2642 on Mechanical 1
-114,-114 to -114,2642 on Mechanical 1

## Text inside footprints (layer, text, board x,y; h text height)
SW5: Top Overlay "PCB Edge" at 3187,770.66 h23.62 r270